# Altium PCB PCB_AIR_QUALITY.PcbDoc
Units mil, origin at the board's own origin, x right, y up, seen from the top; angles counter-clockwise.
Board outline 2008.68 x 2922.66 mil, 2 copper layers (Top Layer, Bottom Layer); 33 components, 20 nets, 123 pads, 44 vias.
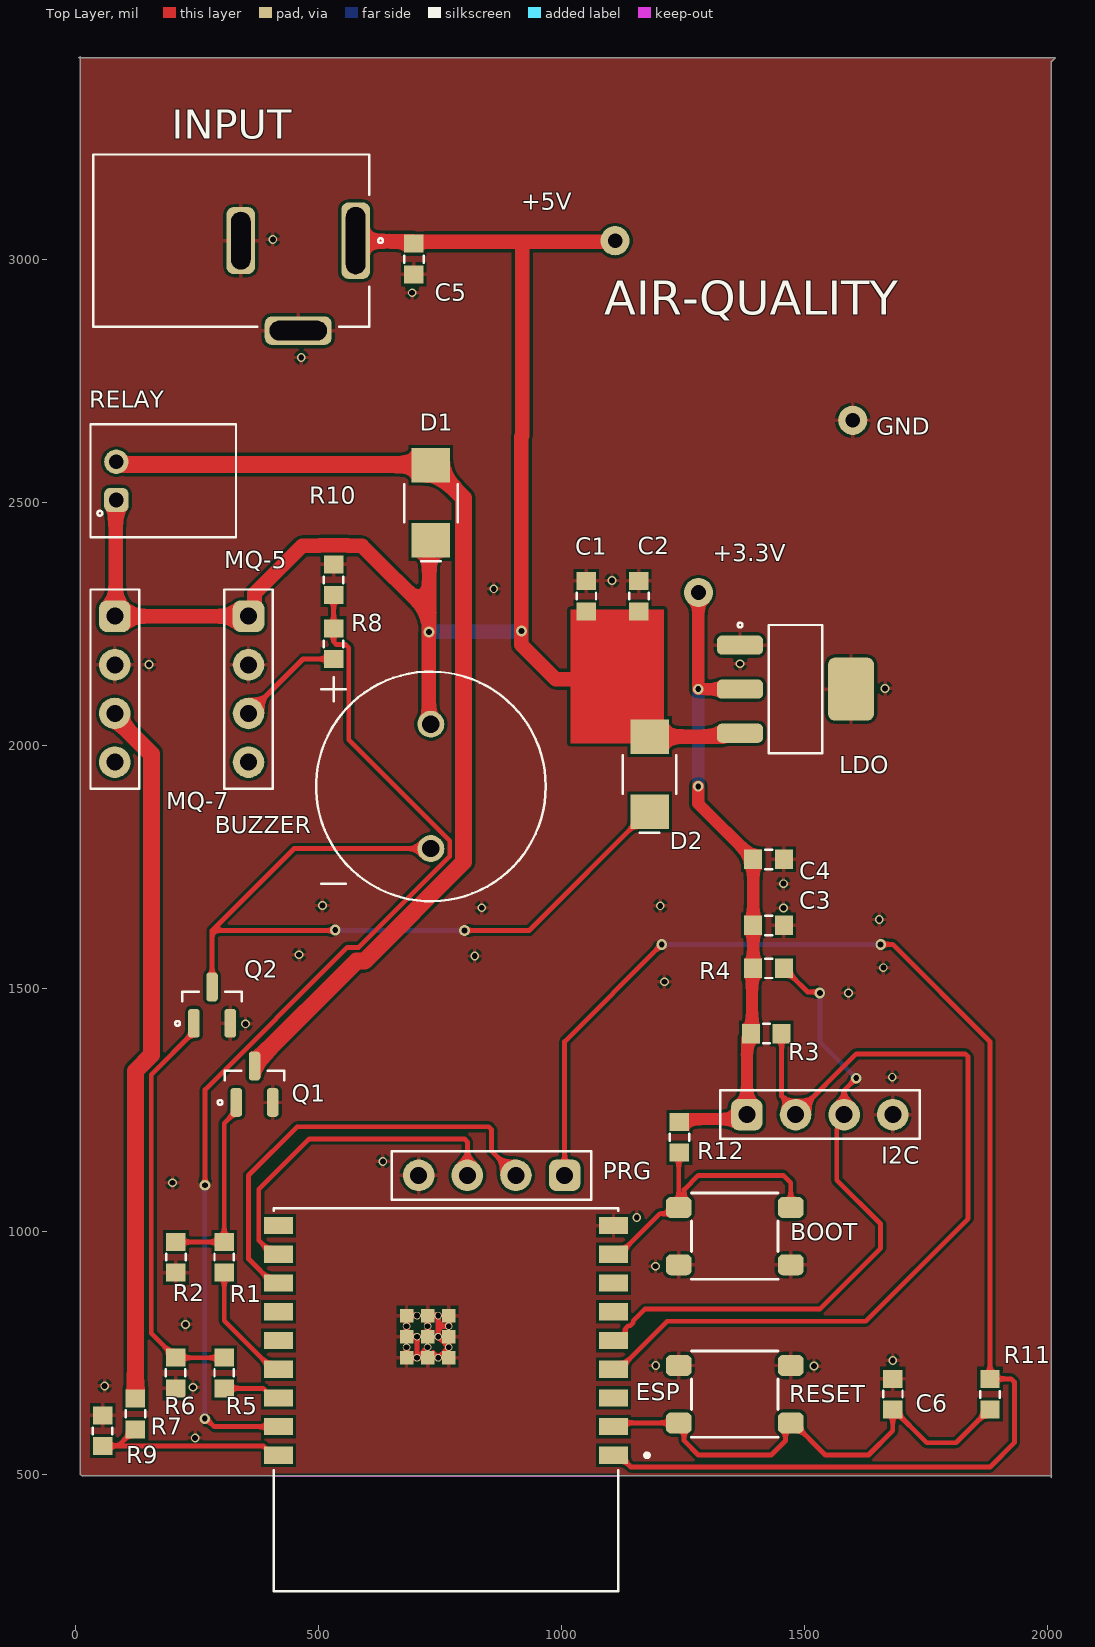
[diagram p0: Top Layer view]
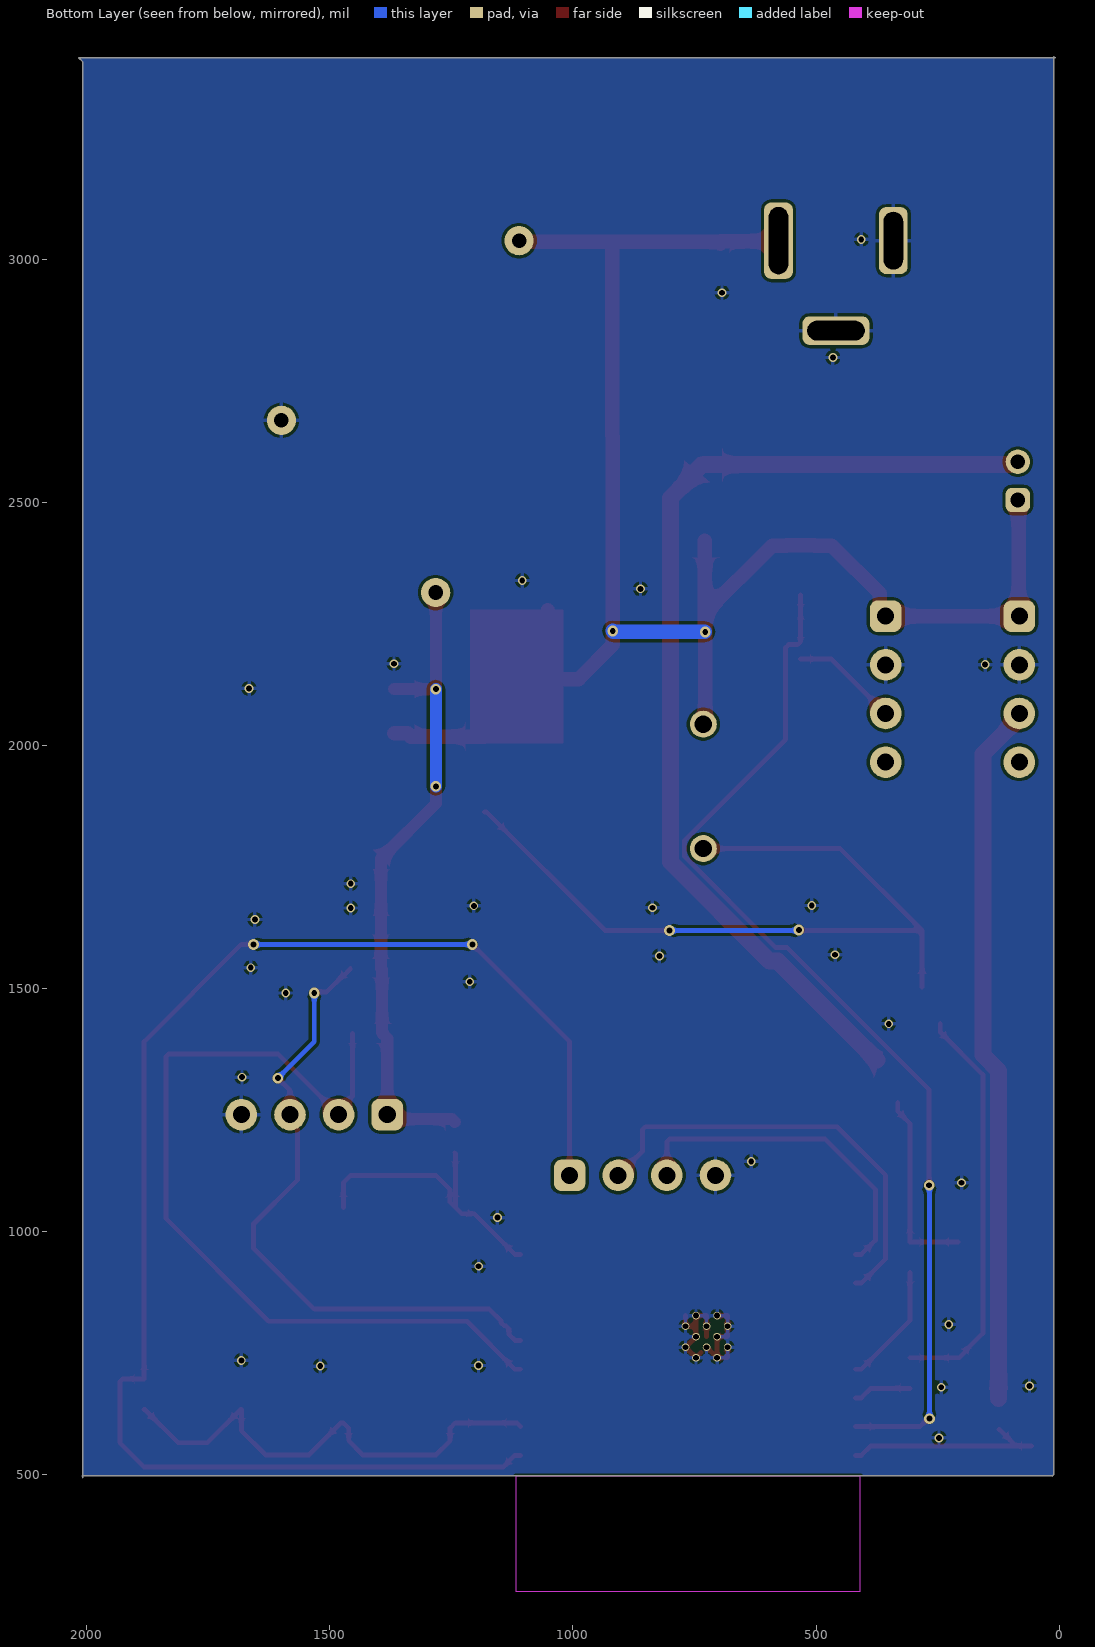
[diagram p1: Bottom Layer view, seen from below]
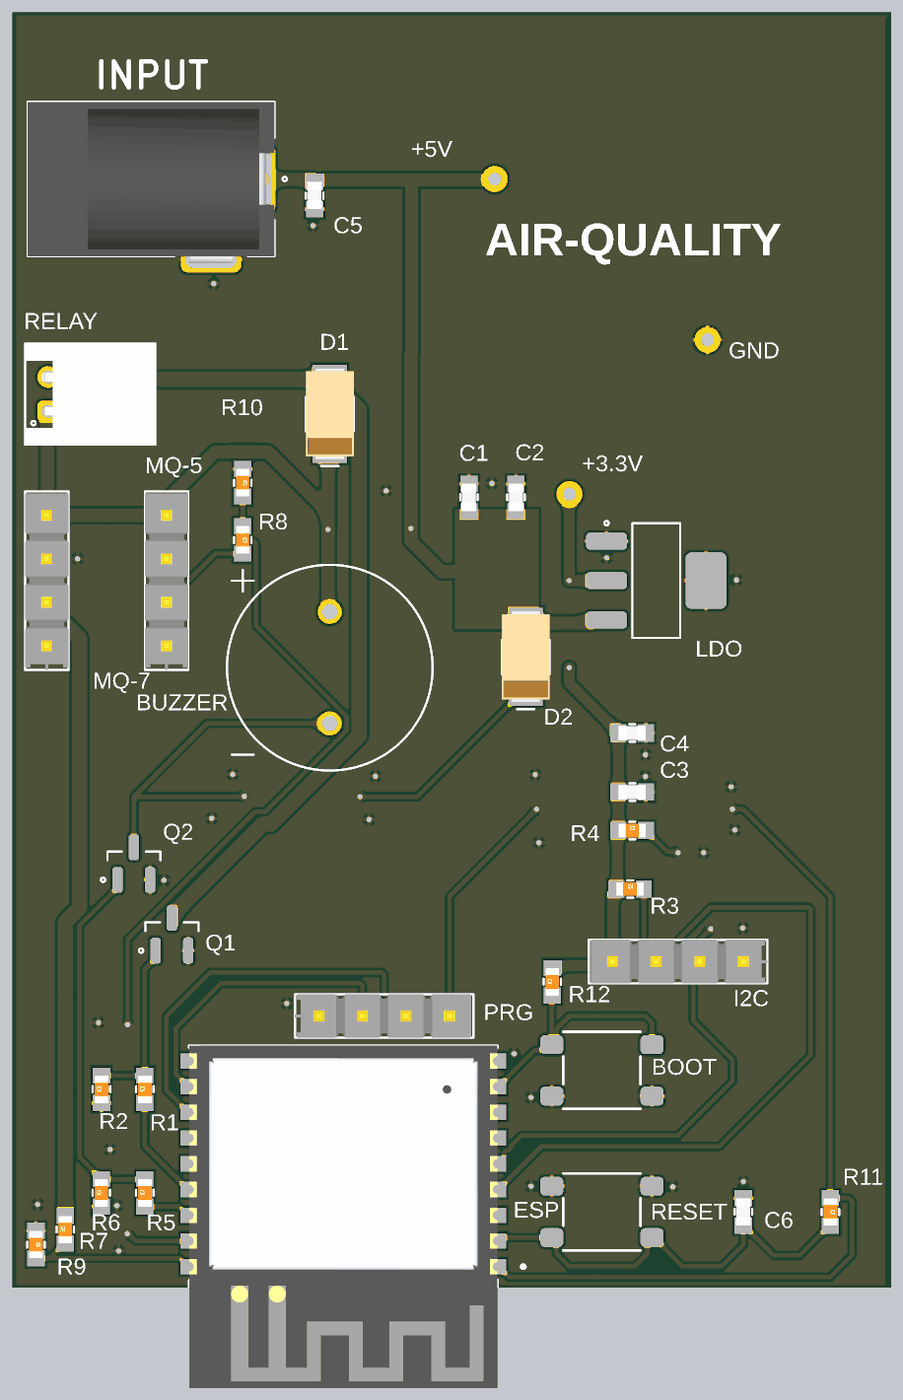
[diagram p2: 3D render of the assembled board from above, using the file's embedded part models]

## Layer stack, top to bottom
Top Solder: solder mask 0.4, Solder Resist, Dk 3.5
Top Layer: signal copper 1.4
Dielectric 1: dielectric 12.6, FR-4, Dk 4.8
Bottom Layer: signal copper 1.4
Bottom Solder: solder mask 0.4, Solder Resist, Dk 3.5

## Board outline
14.38,497.64 11.14,500.88 11.14,3416.78 7.66,3414.85 2016.35,3414.85 2007.66,3406.16 2007.66,494.12 2008.96,498.22 14.95,498.22

## Design rules (kind name [scope] priority, off if disabled: settings)
Clearance Clearance_Is_Vias [IsVia] p1: gap=0 ignorepadtopadclearanceinfootprint=FALSE
Clearance [All] p2: gap=6 ignorepadtopadclearanceinfootprint=FALSE
HoleSize [All] p1: absolutevalues=TRUE maxlimit=150 minlimit=11.5 maxpercent=80.000 minpercent=20.000
MinimumAnnularRing [All] p1: minimumring=1.5
MinimumSolderMaskSliver [All] p1: minsoldermaskwidth=4
PolygonConnect [All] p1: connectstyle=Relief reliefconductorwidth=8 reliefentries=4 polygonreliefangle="90 Angle" airgapwidth=6
RoutingVias [All] p1: holewidth=12 width=22 viastyle="Through Hole" minholewidth=12 minwidth=18 maxholewidth=30 maxwidth=40
SilkToSilkClearance [All] p1: silktosilkclearance=2
SilkToSolderMaskClearance [IsPad] p1: minsilkscreentomaskgap=1 clearancetoexposedcopper=TRUE
SolderMaskExpansion SolderMaskExpansion_Vias [IsVia] p1: expansion=2 istentingtop=TRUE
SolderMaskExpansion [All] p2: expansion=2 istentingtop=FALSE
SupplyNets "Schematic Supply Nets_2" [InNet('+5V')] p1: voltage=0.000
SupplyNets "Schematic Supply Nets_1" [InNet('+3.3V')] p2: voltage=0.000
SupplyNets "Schematic Supply Nets" [InNet('GND')] p3: voltage=0.000
Width Width_2 [InNet('+3.3V')] p1: maxlimit=25 minlimit=25 preferedwidth=25
Width Width_1 [InNet('+5V')] p2: maxlimit=30 minlimit=10 preferedwidth=30
Width [InNet('+5V')] p3: maxlimit=10 minlimit=10 preferedwidth=10
26 further rules are at their usual default settings.

## Classes and differential pairs
component class U_ESP32: BOOT C6 ESP PRG R11 R12 RESET
component class U_Air-Quality: BUZZER C1 C2 C3 C4 C5 D1 D2 I2C INPUT LDO MQ-5 MQ-7 Q1 Q2 R1 R2 R3 R4 R5 R6 R7 R8 R9 R10 RELAY

## Components (designator, comment, footprint, x,y, rotation, side; value= is the part's Value field where it differs from the comment)
BOOT "Sw" Sw_PUSH_4.5x4.5x5mm 1356.85,991.13 r0 top (schematic designator SW1)
BUZZER "AT-1224-TWT-5V-2-R" "BUZZER MAGNETIC 5V 12MM TH" 731.85,1916.13 r0 top (schematic designator B1)
C1 "10uF 10V" 0603_cap 1051.5,2307.21 r90 top value=10uF
C2 "0.1uF 50V" 0603_cap 1159.54,2307.21 r90 top value=0.1uF
C3 "0.1uF 50V" 0603_cap 1426.37,1630.43 r0 top value=0.1uF
C4 "10uF 10V" 0603_cap 1426.37,1766.11 r0 top value=10uF
C5 "10uF 10V" 0603_cap 696.85,3000.75 r270 top value=10uF
C6 "0.1uF 50V" 0603_cap 1681.85,666.13 r90 top value=0.1uF
D1 "30V 3A" SMA 731.85,2499.29 r90 top (schematic designator 1)
D2 "30V 3A" SMA 1181.85,1941.13 r90 top (schematic designator 2)
ESP "ESP32-C3-WROOM-02-N4" ESP32-C3-WROOM-02-N4 762.96,776.56 r180 top (schematic designator U2)
I2C "4x1" H_4x1_TH_2.54mm 1531.85,1241.13 r0 top (schematic designator 3)
INPUT "PWR JACK 2.1mm" CON_POWER_BARREL_2.1MM_3CONN 459.08,3038.56 r270 top (schematic designator J1)
LDO "AMS1117-3.3" SOT_223 1481.85,2116.13 r0 top (schematic designator U1)
MQ-5 "4x1" H_4x1_TH_2.54mm 356.85,2116.13 r270 top (schematic designator 4)
MQ-7 "4x1" H_4x1_TH_2.54mm 81.85,2116.13 r270 top (schematic designator 5)
PRG "4x1" H_4x1_TH_2.54mm 856.85,1116.13 r180 top (schematic designator 6)
Q1 "N CH" SOT_23_3 369.26,1303.53 r90 top
Q2 "N CH" SOT_23_3 281.85,1466.13 r90 top
R1 "100R 1/10W" 0603_res 306.85,947.63 r90 top value=100R
R2 "10k 1/10W" 0603_res 207.4,947.63 r90 top value=10k
R3 "10k 1/10W" 0603_res 1421.66,1407.69 r0 top value=10k
R4 "10k 1/10W" 0603_res 1426.37,1542.1 r0 top value=10k
R5 "100R 1/10W" 0603_res 306.85,709.63 r90 top value=100R
R6 "10k 1/10W" 0603_res 206.85,709.63 r90 top value=10k
R7 "10k 1/10W" 0603_res 124.26,625.36 r90 top value=10k
R8 "10k 1/10W" 0603_res 531.85,2209.63 r270 top value=10k
R9 "10k 1/10W" 0603_res 56.85,591.13 r270 top value=10k
R10 "10k 1/10W" 0603_res 531.85,2341.13 r270 top value=10k
R11 "10k 1/10W" 0603_res 1881.85,666.13 r270 top value=10k
R12 "10k 1/10W" 0603_res 1242.99,1194.26 r90 top value=10k
RELAY "Connector 2pos" CON_2x1_TH_2MM 85,2544.44 r90 top (schematic designator J2)
RESET "Sw" Sw_PUSH_4.5x4.5x5mm 1356.85,666.13 r180 top (schematic designator SW2)

## Footprints (in the part's own frame and the unit in brackets; to place one, negate y for a bottom-side part, rotate by r counter-clockwise, add the part's x,y. Pads: shape width x height; smd on the part's side, far side on the other; paste and mask are expansions set on the pad)
0603_cap [mil]
  rect 37x40 smd: 1(-31.5,0) 2(31.5,0)
  silkscreen extent -7,-20 8,20, body extent -31,-17 31,17, height 34
0603_res [mil] "1608 Metric / 20190225 / C-A.Serna.A"
  rect 37x40 smd: 1(-31.5,0) 2(31.5,0)
  silkscreen extent -7,-20 8,20, body extent -31,-16 32,16, height 12
"BUZZER MAGNETIC 5V 12MM TH" [mm]
  round 1.408 hole 0.9: N(0,-3.25) P(0,3.25)
  silkscreen extent -6,-6 6,6
CON_2x1_TH_2MM [mil] "/20190307/N-A.Potosi"
  rrect50% 50x50 hole 30: 1(-39.37,0)
  round 50 hole 30: 2(39.37,0)
  silkscreen extent -116,-246 116,53, body extent -117,-247 116,52, height 189
CON_POWER_BARREL_2.1MM_3CONN [mm]
  rrect50% 4x1.5 hole 1.016 slot 3.5 at 0 deg: 1(0,3)
  rrect50% 3.5x1.5 hole 1.016 slot 3 at 0 deg: 2(0,-3)
  rrect50% 1.5x3.5 hole 1.016 slot 3 at 90 deg: 3(4.7,0)
  silkscreen extent -4.5,-10.7 4.5,4.43, body extent -4.5,-10.7 4.9,3.7, height 11
ESP32-C3-WROOM-02-N4 [mm]
  rect 1.5x0.9 smd: 1(-8.75,6) 2(-8.75,4.5) 3(-8.75,3) 4(-8.75,1.5) 5(-8.75,0) 6(-8.75,-1.5) 7(-8.75,-3) 8(-8.75,-4.5) 9(-8.75,-6) 10(8.75,-6) 11(8.75,-4.5) 12(8.75,-3) 13(8.75,-1.5) 14(8.75,0) 15(8.75,1.5) 16(8.75,3) 17(8.75,4.5) 18(8.75,6)
  rect 0.7x0.7 smd: 19(-0.14,0.9) 19(-0.14,-0.2) 19(-0.14,-1.3) 19(0.96,0.9) 19(0.96,-0.2) 19(0.96,-1.3) 19(2.06,-1.3) 19(2.06,-0.2) 19(2.06,0.9)
  round 0.4 hole 0.3 mask+0: 19(-0.14,0.35) 19(-0.14,-0.75) 19(0.41,0.9) 19(0.41,-0.2) 19(0.41,-1.3) 19(0.96,0.35) 19(0.96,-0.75) 19(1.51,0.9) 19(1.51,-0.2) 19(1.51,-1.3) 19(2.06,-0.75) 19(2.06,0.35)
  Keep-Out Layer region: 9,7.1 -9,7.1 -9,13.1 9,13.1
  Keep-Out Layer region: 9,7.1 -9,7.1 -9,13.1 9,13.1
  silkscreen extent -10.6,-6.9 9,13.1, body extent -9,-6.9 9,13.1, height 3.35
H_4x1_TH_2.54mm [mil]
  rrect50% 65x65 hole 35: 1(-150,0)
  round 65 hole 35: 2(-50,0) 3(50,0) 4(150,0)
  silkscreen extent -205,-50 205,50, body extent -200,-50 205,50, height 420
SMA [mm]
  rect 1.8x2 smd: 1(-1.965,0) 2(1.965,0)
  silkscreen extent -3.05,-1.4 0.98,1.4, body extent -2.64,-1.4 2.64,1.4, height 2.34
SOT_23_3 [mm]
  rrect50% 1.5x0.6 smd: 1(-0.95,0.95) 2(-0.95,-0.95) 3(0.95,0)
  silkscreen extent -1.07,-1.55 0.7,1.92, body extent -0.7,-1.52 0.7,1.53, height 1.12
SOT_223 [mm]
  rrect50% 2.4x1 smd: 1(-2.9,2.3) 2(-2.9,0) 3(-2.9,-2.3)
  rrect30% 2.4x3.3 smd: 4(2.9,0)
  silkscreen extent -3.02,-3.35 1.4,3.47, body extent -1.86,-3.35 1.86,3.35, height 1.8
Sw_PUSH_4.5x4.5x5mm [mm]
  rrect50% 1.35x1.1 smd: 1(-2.925,1.5) 1(2.925,1.5) 2(-2.925,-1.5) 2(2.925,-1.5)
  silkscreen extent -2.25,-2.25 2.25,2.25, body extent -2.25,-2.25 2.25,2.25, height 5

## Part data
BOOT RESET: library part Sw_PUSH_4.5x4.5x5.0xmm, "SWITCH TACTILE SPST-NO 0.05A 12V", Manufacturer=BZCN, Manufacturer Part Number=TSC015A05026A, Supplier Part Number 1=C2888509, ComponentLink1Description=LCSC, ComponentLink1URL=https://www.lcsc.com/product-detail/Tactile-Switches_BZCN-TSC015A05026A_C2888509.html, Last modified by=N-A.Potosi, Last modified date=20190222, Supplier 1=LCSC
BUZZER: "Buzzers Transducer, Externally Driven Electromechanical/Magnetic 5 V 40mA 2.4kHz 87dB @ 5V, 10cm Through Hole PC Pins", Manufacturer="PUI Audio, Inc.", ComponentLink1Description=DigiKey, ComponentLink2Description=Datasheet, Manufacturer PN=AT-1224-TWT-5V-2-R, Supplier 1=DigiKey
C1 C4 C5: library part Cap_10uF_0603_10V, "10V 10uF X5R ±10% 0603 Multilayer Ceramic Capacitors MLCC - SMD/SMT ROHS", Manufacturer=CCTC, Manufacturer Part Number=TCC0603X5R106K100CT, Supplier Part Number 1=C380314, ComponentLink1Description=LCSC, ComponentLink1URL=https://www.lcsc.com/product-detail/Multilayer-Ceramic-Capacitors-MLCC-SMD-SMT_CCTC-TCC0603X5R106K100CT_C380314.html, Supplier 1=LCSC
C2 C3 C6: library part Cap_0.1uF_0603_50V, "50V 100nF Y5V -20%~+80% 0603 Multilayer Ceramic Capacitors MLCC - SMD/SMT ROHS", Manufacturer="Walsin Tech Corp", Manufacturer Part Number=0603F104Z500CT, Supplier Part Number 1=C83060, ComponentLink1Description=LCSC, ComponentLink1URL=https://www.lcsc.com/product-detail/Multilayer-Ceramic-Capacitors-MLCC-SMD-SMT_Walsin-Tech-Corp-0603F104Z500CT_C83060.html, Supplier 1=LCSC
D1 D2: library part D_Schottky_40V_3A_SMA, "40V Independent 3A 550mV@3A SMA Schottky Diodes ROHS", Manufacturer=TDSEMIC, Manufacturer Part Number=SS34-TD, Supplier Part Number 1=C46550832, ComponentLink1Description=LCSC, ComponentLink1URL=https://lcsc.com/product-detail/Schottky-Diodes_TDSEMIC-SS34-TD_C46550832.html, Supplier 1=LCSC
ESP: library part MCU_ESP32-C3-WROOM-02-N4, "RF TXRX MOD BT WIFI PCB TH SMD", Manufacturer="Espressif Systems", Supplier Part Number 1=C2934560, ComponentLink1Description=LCSC, ComponentLink1URL=https://lcsc.com/product-detail/WiFi-Modules_Espressif-Systems-ESP32-C3-WROOM-02-N4_C2934560.html, Manufacturer Part Number=ESP32-C3-WROOM-02-N4, Supplier 1=LCSC
I2C MQ-5 MQ-7 PRG: library part H_Male_4x1_TH_100mil, "H_Male_4x1_TH_100mil", ComponentLink1Description=LCSC
INPUT: library part Con_Power_Jack_2.1mm_3pins, "CONN PWR JACK 2X5.5MM SOLDER", Manufacturer=HCTL, Manufacturer Part Number=HC-DC-005-2.0T, Supplier Part Number 1=C3010533, ComponentLink1Description=LCSC, ComponentLink1URL=https://www.lcsc.com/product-detail/AC-DC-Power-Connectors_HCTL-HC-DC-005-2-0T_C3010533.html, Supplier 1=LCSC
LDO: library part LDO_3V3_1A_FIXED, "1A 60dB@(120Hz) Fixed 3.3V Positive 18V SOT-223 Linear Voltage Regulators (LDO) ROHS", Manufacturer="UMW(Youtai Semiconductor Co., Ltd.)", Supplier Part Number 1=C347222, ComponentLink1Description=LCSC, ComponentLink1URL=https://www.lcsc.com/product-detail/_UMW-Youtai-Semiconductor-Co-Ltd-_C347222.html, Manufacturer Part Number=AMS1117-3.3, Supplier 1=LCSC
Q1 Q2: library part Q_NFET_20V_3.2A_SOT23, "MOSFET N-CH 20V SOT23", Manufacturer=Doeshare, Manufacturer Part Number=DN2302S, Supplier Part Number 1=C2931750, ComponentLink1Description=LCSC, ComponentLink1URL=https://www.lcsc.com/product-detail/MOSFETs_Doeshare-DN2302S_C2931750.html, Supplier 1=LCSC
R1 R5: library part Res_100R_0603_1/10W, "RES SMD 100R OHM 5% 1/10W 0603", Manufacturer=FOJAN, Manufacturer Part Number="FRC0603J101 TS", Supplier Part Number 1=C2907089, ComponentLink1Description=LCSC, ComponentLink1URL=https://www.lcsc.com/product-detail/Chip-Resistor-Surface-Mount_FOJAN-FRC0603J101-TS_C2907089.html, Supplier 1=LCSC
R2 R3 R4 R6 R7 R8 R9 R10 R11 R12: library part Res_10k_0603_1/10W, "RES SMD 10k OHM 5% 1/10W 0603", Manufacturer=FOJAN, Manufacturer Part Number=FRC0603J103TS, Supplier Part Number 1=C2930027, ComponentLink1Description=LCSC, ComponentLink1URL=https://www.lcsc.com/product-detail/Chip-Resistor-Surface-Mount_FOJAN-FRC0603J103TS_C2930027.html, Supplier 1=LCSC
RELAY: library part Con_2x1_TH_JST_2MM, "2POS 2MM", Manufacturer=JST, Manufacturer Part Number=S2B-PH-K-S(LF)(SN), Supplier Part Number 1=C173752, ComponentLink1Description=Digi-Key, ComponentLink1URL=https://lcsc.com/product-detail/Wire-To-Board-Connector_JST-S2B-PH-K-S-LF-SN_C173752.html, Supplier 1=LCSC

## Free pads (board coordinates)
  round 60 hole 30: TP-3.3V(1282.25,2314.82) TP-5V(1110.71,3038.44) TP-GND(1599.52,2669.02)

## Via types
v1: diameter 18, hole 12, Top Layer to Bottom Layer, tented both sides, 32 vias
v2: diameter 22, hole 12, Top Layer to Bottom Layer, tented both sides, 12 vias

## Nets (pads, with @x,y where several pads share a name; then routed paths per layer and width w, separated by ;. In a path a pad name is that pad's centre, name@x,y a point inside that pad or via, vN(x,y) a via of type N, cw(c..) or ccw(c..) an arc to the next point about the centre after c; other vN are vias at no path point)
3V3: ESP.1 PRG.1 R11.1 | length 3041.8
  Top Layer w10: PRG.1 1006.85,1391.13 v2(1206.85,1591.13) ; ESP.1 1119.26,540.34 1143.47,516.13 1881.85,516.13 1931.85,566.13 1931.85,691.13 1925.35,697.63 R11.1 1881.85,1391.13 1681.85,1591.13 v2(1656.85,1591.13)
  Bottom Layer w10: v2@1206.99,1591 v2@1656.72,1591
+3.3V: C3.1 C4.1 I2C.1 LDO.2 pad.TP-3.3V R3.1 R4.1 R12.2 | length 1357.1
  Top Layer w25: R12.2 1248.99,1231.76 1372.49,1231.76 I2C.1 1381.85,1397.88 1390.16,1406.19 R3.1 1392.52,1410.04 1392.52,1539.75 R4.1 C3.1 C4.1 1394.87,1767.61 1281.85,1880.62 v2(1281.85,1916.13) ; pad.TP-3.3V 1281.85,2314.43 v2(1281.85,2116.13) LDO.2
  Bottom Layer w25: v2(1281.85,1916.13) v2(1281.85,2116.13)
+5V: BUZZER.P C1.1 C2.1 C5.1 D1.1 D2.2 INPUT.1 LDO.3 MQ-5.1 MQ-7.1 pad.TP-5V RELAY.1 | length 3430.4
  Top Layer w30: RELAY.1 83.43,2503.5 83.43,2267.7 MQ-7.1 MQ-5.1 369.19,2278.47 369.19,2312.91 467.43,2411.14 502.17,2411.14 503.16,2412.13 560.55,2412.13 561.54,2411.14 590.15,2411.14 728.47,2272.82 ; INPUT.1 578.37,3037.38 C5.1@696.85,3037.38 ; C5.1 700.35,3035.75 717.64,3035.75 718.46,3036.57 919.52,3036.57 ; D1.1@728.47,2421.38 728.47,2272.82 ; BUZZER.P 727.83,2048.1 v2(727.83,2233.55) 728.47,2234.19 728.47,2272.82 ; C1.1@1051.94,2278.01 1051.5,2277.58 1051.5,2234.99 1059.48,2227.01 ; pad.TP-5V@1108.84,3036.57 919.52,3036.57 ; 1115.33,2142.24 1109.83,2136.75 988.54,2136.75 918.17,2207.11 918.17,2635.54 919.52,2636.89 919.52,3036.57 ; D2.2 1333.04,2018.49 1340.12,2025.58 LDO.3
  Bottom Layer w30: v2@728.64,2234.36 916.66,2234.36 v2(918.17,2235.87)
GND: BOOT.2 C1.2 C2.2 C3.2 C4.2 C5.2 C6.2 ESP.9 ESP.19 I2C.4 INPUT.2 INPUT.3 LDO.1 LDO.4 MQ-5.2 MQ-7.2 pad.TP-GND PRG.4 Q1.2 Q2.2 R2.1 R6.1 R9.1 R10.1 RESET.2 | length 432.4
  Top Layer w10: v1(465.3,2798.25) v1@465.45,2798.1 ; ESP.19@681.85,762.78 681.85,741.13 ESP.19@703.51,741.13 ; ESP.19@681.85,805.08 681.85,784.44 703.51,784.44 ESP.19@703.51,741.13 ; ESP.19@682.27,805 681.85,805.42 681.85,827.74 ESP.19@703.51,827.74 ; ESP.19@725.16,762.78 ESP.19@703.51,741.13 ; ESP.19@725.16,784.44 725.16,806.09 725.16,827.74 746.82,827.74 746.82,806.09 ; ESP.19@735.99,751.96 746.82,741.13 768.47,762.78 746.82,784.44 746.82,806.09 ; ESP.19@768.47,827.74 768.47,806.09 746.82,806.09
  other v1: 247.09,576.24 242.61,680.53 60.95,683.17 1519.78,723.91 1194.2,725.06 1681.88,735.62 226.99,809.61 1193.91,929.1 1155.23,1029.35 200.62,1100.87 633.09,1144.91 1680.67,1318.14 350.61,1427.77 1590.75,1491.18 1212.24,1514.22 1662.47,1543.35 822.13,1567.34 460.83,1570.04 1654,1642.4 1456.85,1666.13 836.47,1666.66 1203.76,1670.48 508.83,1671.08 1456.85,1716.13 1666.02,2117.61 152.18,2166.57 1367.89,2168.54 861.06,2322.39 1104.32,2339.56 693.4,2931.56 406.85,3041.13
MQ2_AO: MQ-5.3 R8.2 | length 221.4
  Top Layer w10: MQ-5.3 468.85,2178.13 R8.2
MQ7_AO: MQ-7.3 R7.2 | length 1453.8
  Top Layer w35: MQ-7.3 81.85,2058.01 156.85,1983.01 156.85,1363.72 124.26,1331.12 R7.2
Net1_2: D1.2 Q1.3 RELAY.2 | length 2085.2
  Top Layer w35: RELAY.2 87.87,2580.94 98.48,2580.94 101.47,2577.95 730.56,2577.95 D1.2 ; Q1.3@374.94,1352.96 578.63,1556.65 595.38,1556.65 799.07,1760.33 799.07,2509.44 753.72,2554.78 753.72,2558.72 D1.2@735.79,2576.65
Net2_1: BUZZER.N D2.1 Q2.3 | length 1637.9
  Top Layer w10: Q2.3 281.85,1619.68 ; v2(535.34,1620.78) 534.25,1619.68 281.85,1619.68 ; BUZZER.N 450.35,1788.18 281.85,1619.68 ; v2(801.17,1619.74) 933.89,1619.74 1177.92,1863.77 D2.1
  Bottom Layer w10: v2(535.34,1620.78) 536.38,1619.74 v2(801.17,1619.74)
Net3_2: ESP.4 I2C.2 R3.2 | length 1778.3
  Top Layer w10: ESP.4 1119.26,717.51 1217.88,816.13 1626,816.13 1836.7,1026.83 1836.7,1360.27 1830.84,1366.13 1606.85,1366.13 I2C.2 1481.85,1250.92 1453.16,1279.61 R3.2
Net3_3: ESP.5 I2C.3 R4.2 | length 1342.9
  Top Layer w10: ESP.5 1118.96,776.56 1131.67,789.28 1131.67,800.79 1137.78,806.9 1141.53,806.9 1147.97,813.34 1147.97,817.09 1172.01,841.13 1531.85,841.13 1656.85,966.13 1656.85,1016.13 1566.68,1106.31 1566.68,1211.07 1581.85,1226.25 1581.85,1291.13 v2(1606.85,1316.13) ; R4.2 1457.87,1540.6 1471.37,1527.1 1472.87,1527.1 1506.55,1493.42 1529.56,1493.42 v2(1531.85,1491.13)
  Bottom Layer w10: v2(1531.85,1491.13) 1531.85,1391.13 v2(1606.85,1316.13)
NetC6_1: C6.1 ESP.2 R11.2 RESET.1 | length 1010.7
  Top Layer w10: ESP.2 1115.12,607.07 1241.7,607.07 1252.56,596.21 1252.56,570.42 1281.85,541.13 1431.85,541.13 1461.15,570.42 1461.15,596.21 1472.01,607.07 1476.93,607.07 1542.88,541.13 1631.85,541.13 1681.85,591.13 C6.1 1683.35,634.63 1751.85,566.13 1811.85,566.13 1880.35,634.63 R11.2
NetQ1_1: Q1.1 R1.2 R2.2 | length 396.8
  Top Layer w10: R2.2 R1.2 306.85,1223.41 331.85,1248.41 Q1.1
NetQ2_1: Q2.1 R5.2 R6.2 | length 845.5
  Top Layer w10: Q2.1 244.45,1411.01 156.85,1323.41 156.85,791.13 191.85,756.13 191.85,754.63 205.35,741.13 R6.2 R5.2
NetR1_1: ESP.15 R1.1 | length 251.8
  Top Layer w10: R1.1 306.85,817.31 406.66,717.51 ESP.15
NetR5_1: ESP.16 R5.1 | length 119.8
  Top Layer w10: R5.1 386.98,678.13 406.66,658.45 ESP.16
NetR7_1: ESP.18 R7.1 R9.2 | length 418.9
  Top Layer w10: R9.2 90.03,559.63 ; R7.1 122.76,593.86 97.1,568.2 97.1,566.7 90.03,559.63 ; ESP.18 406.66,540.34 387.37,559.63 90.03,559.63
NetR8_1: ESP.17 R8.1 R10.2 | length 2184.7
  Top Layer w10: v2(266.71,615.82) 269.96,615.82 286.38,599.4 ESP.17 ; v2(267.44,1095.86) 267.44,1292.55 560.04,1585.15 583.58,1585.15 770.57,1772.14 770.57,1804.21 562.85,2011.93 562.85,2201.19 556.41,2207.63 537.71,2207.63 531.85,2213.49 R8.1 R10.2
  Bottom Layer w10: v2(266.71,615.82) 266.71,1087.8 266.71,1095.13 v2(267.44,1095.86)
NetR12_1: BOOT.1 ESP.8 R12.1 | length 617.1
  Top Layer w10: ESP.8 1119.26,953.73 1202.66,1037.13 1228.64,1037.13 BOOT.1@1241.7,1050.18 ; R12.1 1241.7,1161.46 BOOT.1@1241.7,1050.18 ; BOOT.1@1472.01,1050.18 1472.01,1100.97 1456.85,1116.13 1281.85,1116.13 1252.56,1086.84 1252.56,1061.05 BOOT.1@1241.7,1050.18
RXD: ESP.11 PRG.3 | length 700.7
  Top Layer w10: ESP.11 406.66,953.73 377.94,982.44 377.94,1087.22 481.85,1191.13 801,1191.13 806.85,1185.27 PRG.3
TXD: ESP.12 PRG.2 | length 912.6
  Top Layer w10: ESP.12 406.66,894.67 356.85,944.48 356.85,1116.13 456.85,1216.13 851,1216.13 856.85,1210.27 856.85,1166.13 PRG.2
pads on no net: ESP.3 ESP.6 ESP.7 ESP.10 ESP.13 ESP.14 MQ-5.4 MQ-7.4

## Polygon pours and split planes (outlines as drawn)
GND on Bottom Layer "BOTTOM_GND" (solid, remove dead copper, pour order 7): 14.38,497.64 11.14,500.88 11.14,3416.78 7.66,3414.85 2016.35,3414.85 2007.66,3406.16 2007.66,494.12 2008.96,498.22 14.95,498.22
GND on Top Layer "TOP_GND" (solid, remove dead copper, pour order 6): 14.38,497.64 11.14,500.88 11.14,3416.78 7.66,3414.85 2016.35,3414.85 2007.66,3406.16 2007.66,494.12 2008.96,498.22 14.95,498.22

## Other copper
Top Layer:
  rectangle net +5V: 1019.24,2004.81 1211.41,2279.68

## Silkscreen, mask and mechanical layers (free items; w line width, h text height)
Top Overlay:
  text "+5V" at 918.18,3089.59 h60
  text "AIR-QUALITY" at 1088.38,2862.96 h120
  text "GND" at 1647.88,2626.94 h60
  text "+3.3V" at 1311.49,2367.18 h60
Board Shape:
  lines w10: 7.66,3414.85 2016.35,3414.85 2007.66,3406.16 2007.66,498.22 35.03,498.22 14.95,498.22 13.8,497.06 ; 11.14,3416.78 11.14,500.88 14.38,497.64

## Dimensions
13.8,497.06 to 2007.66,498.22 on Board Shape